# Altium PCB GR_carte_action27.PcbDoc
Units mil, origin at the board's own origin, x right, y up, seen from the top; angles counter-clockwise.
Board outline 3105 x 2675 mil, 2 copper layers (Top Layer, Bottom Layer); 55 components, 45 nets, 211 pads, 0 vias.
Unrouted connection lines stored in the file: 4.
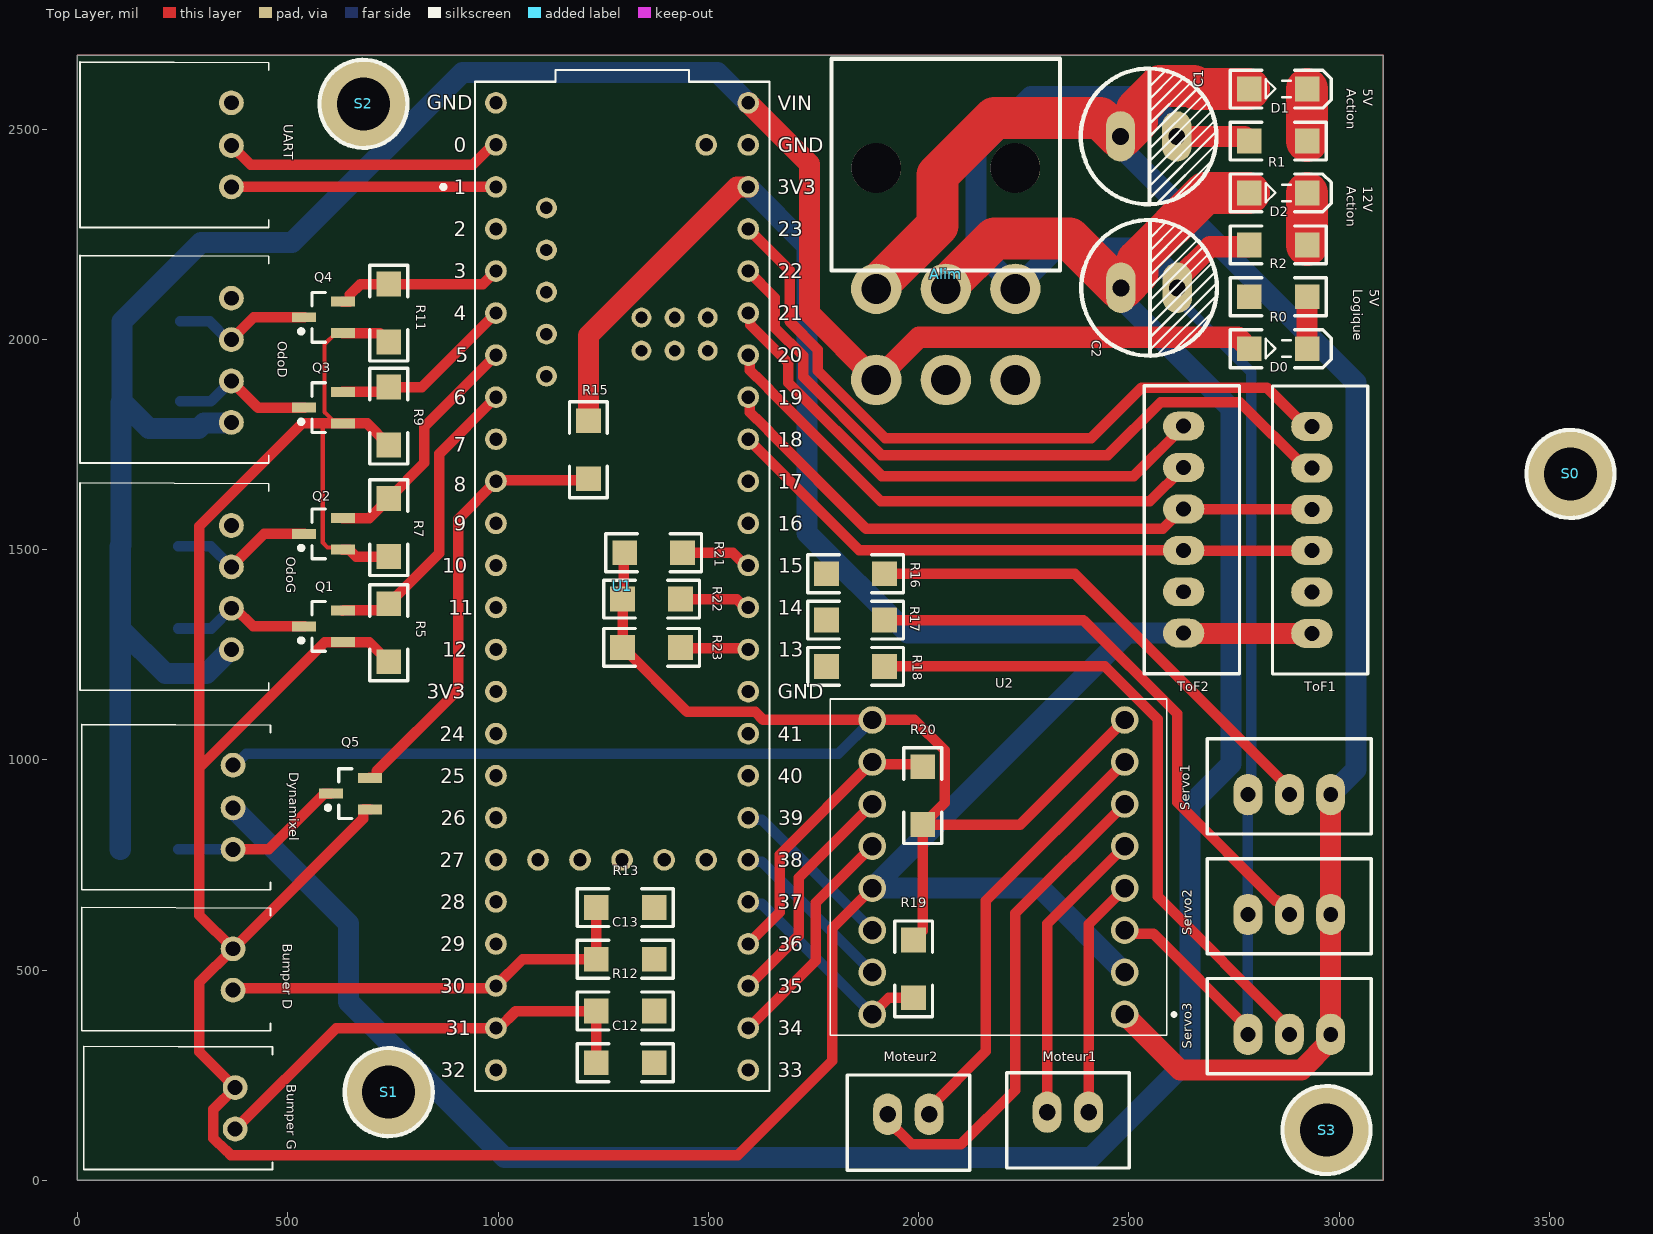
[diagram p0: Top Layer view]
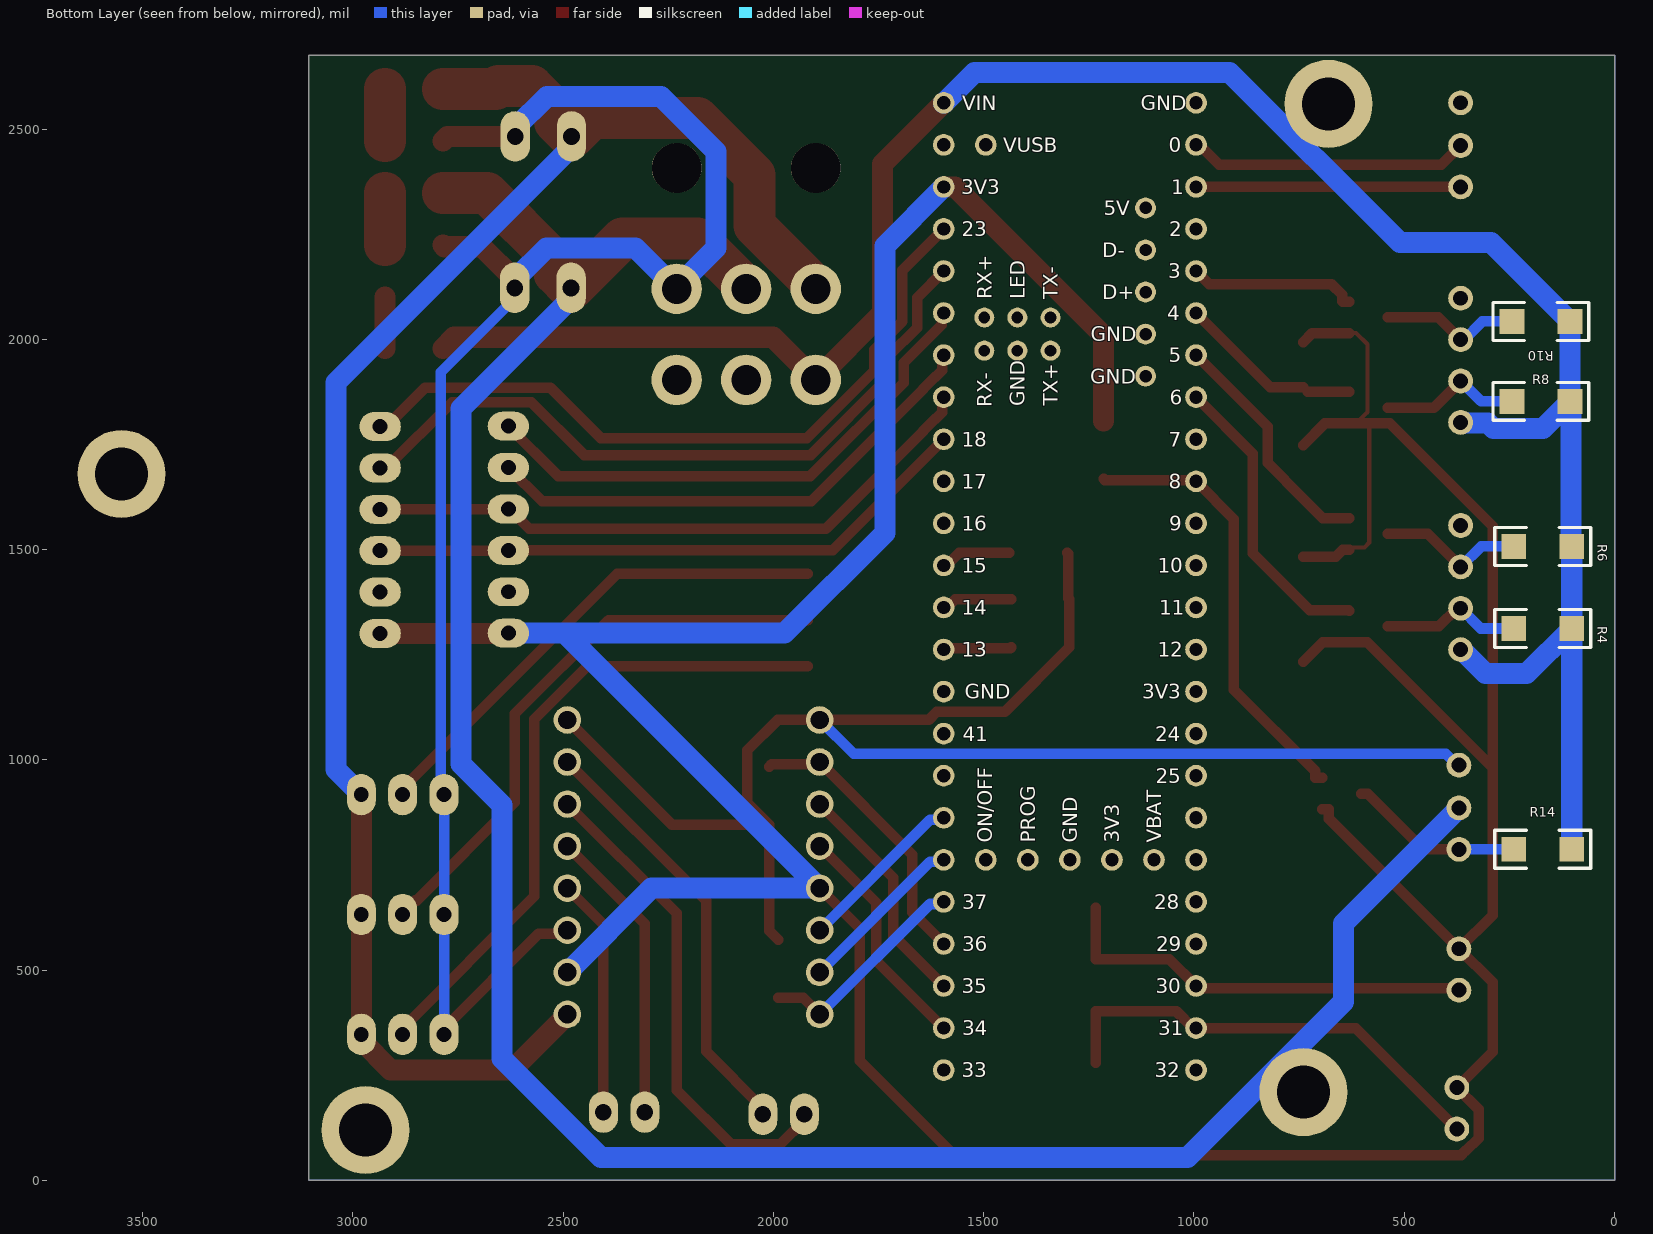
[diagram p1: Bottom Layer view, seen from below]
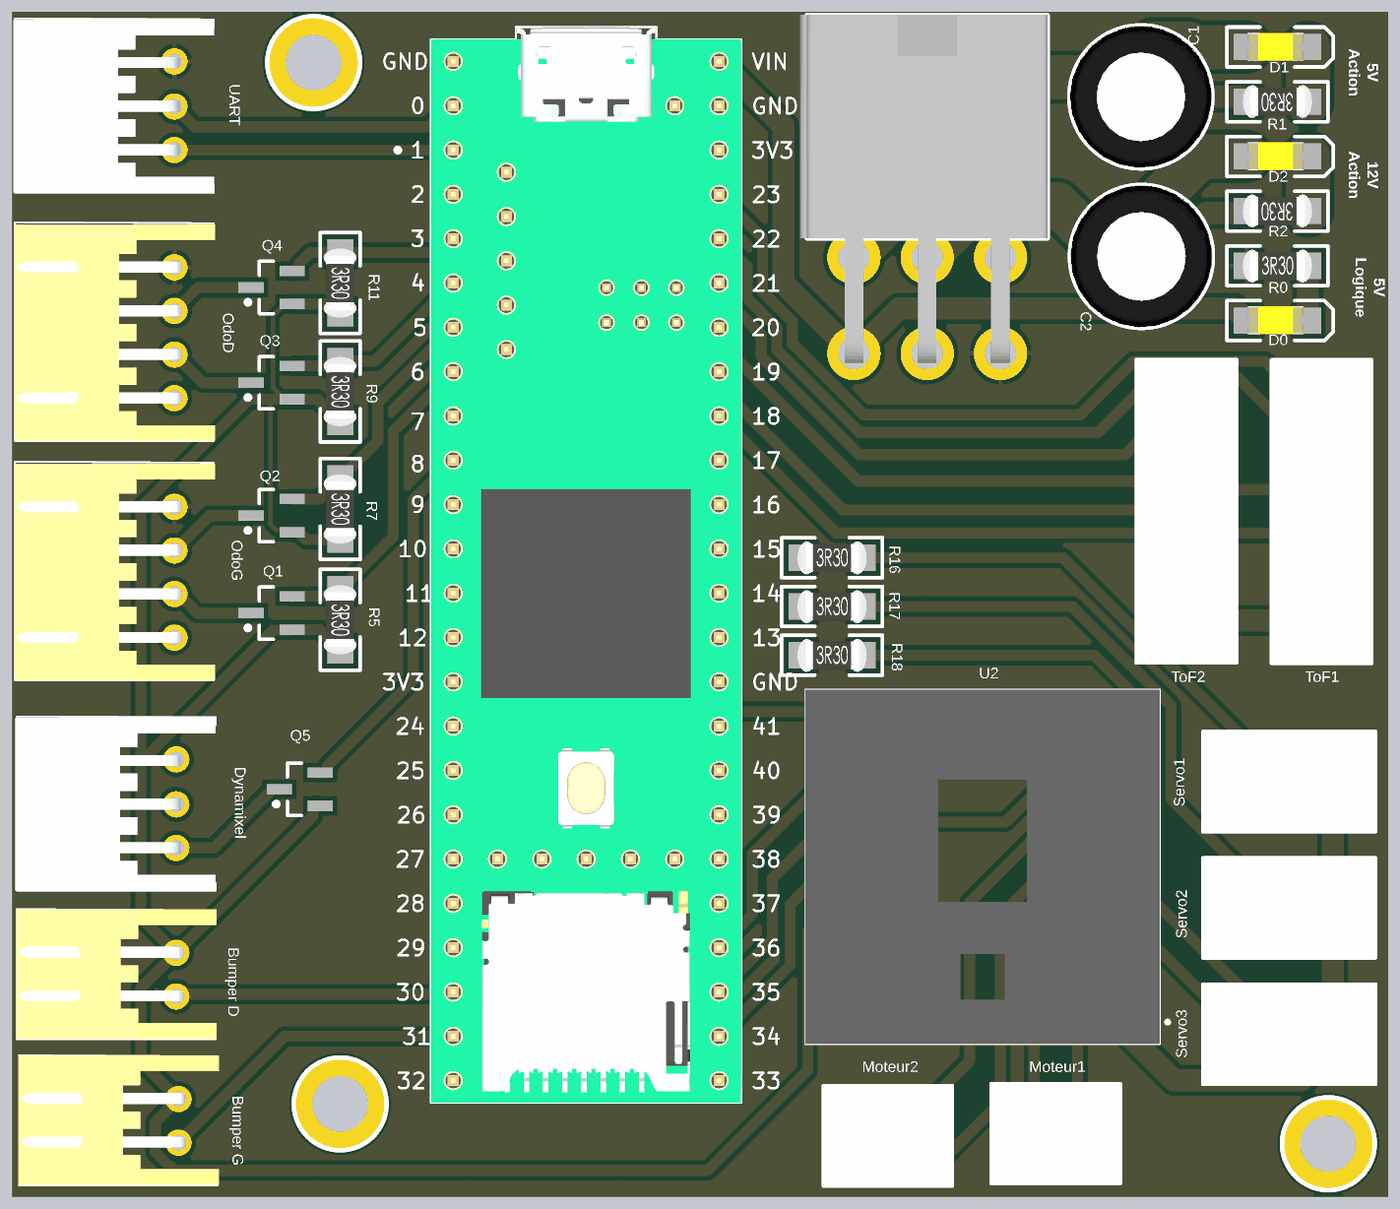
[diagram p2: 3D render of the assembled board from above, using the file's embedded part models]
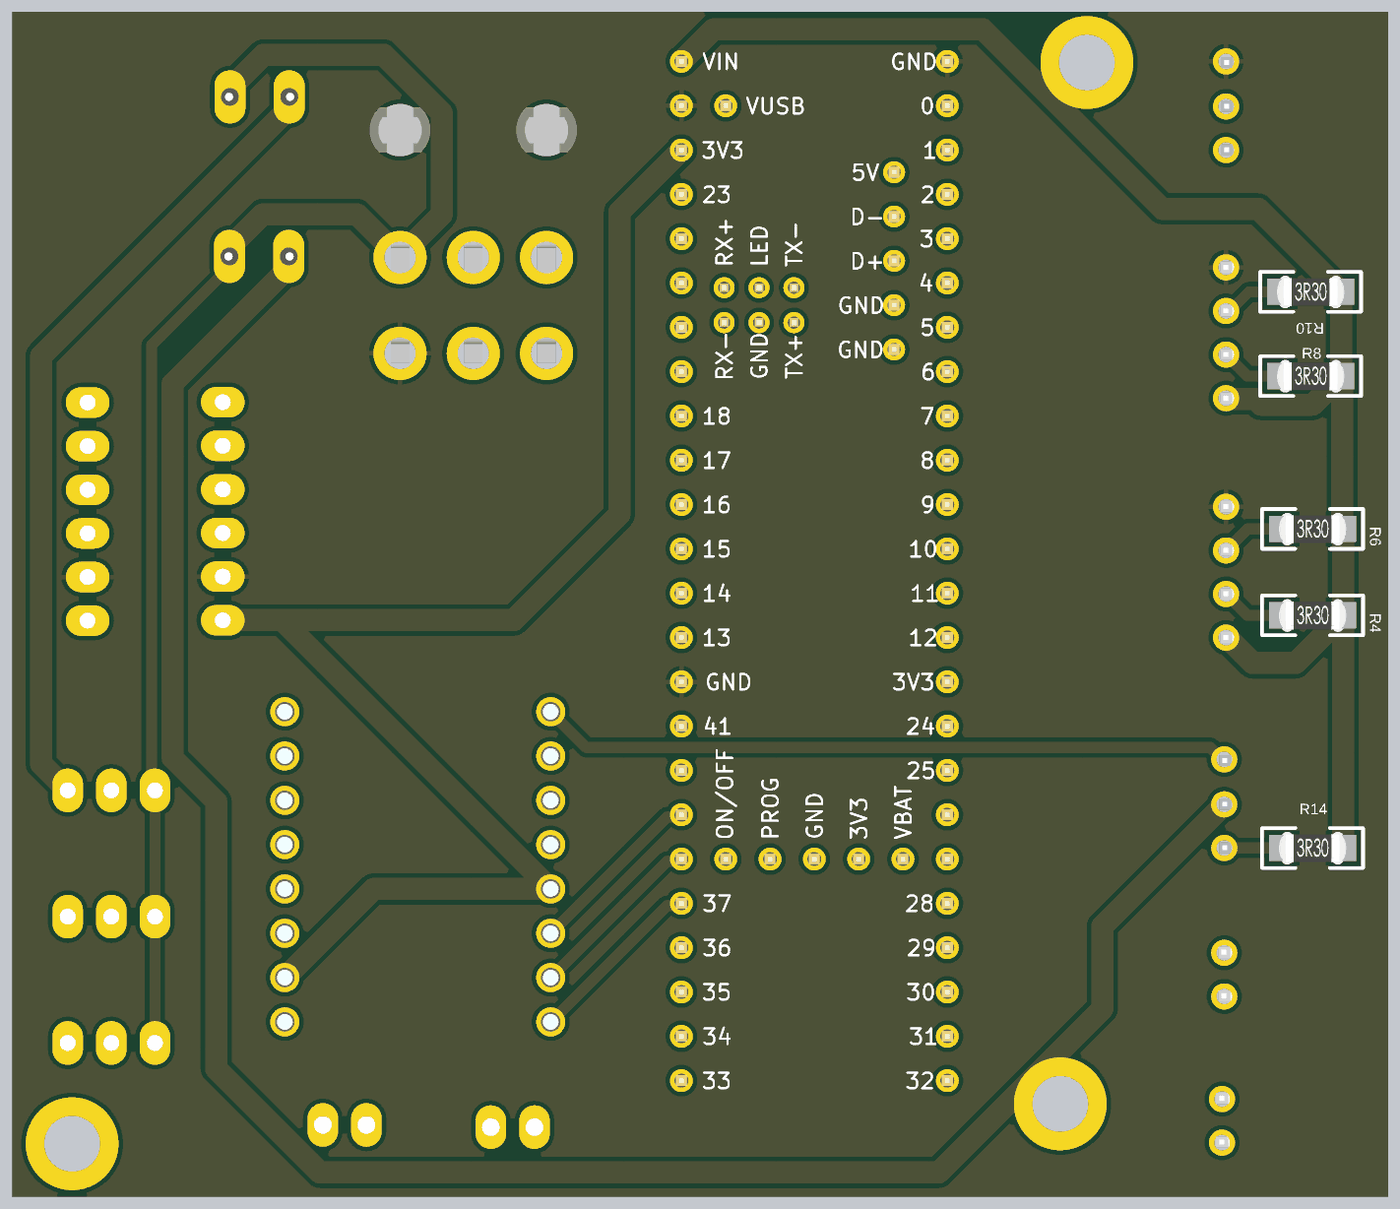
[diagram p3: 3D render of the assembled board from below, using the file's embedded part models]

## Layer stack, top to bottom
Top Solder: solder mask 0.4, Solder Resist, Dk 3.5
Top Layer: signal copper 1.4
Dielectric 1: dielectric 12.6, FR-4, Dk 4.8
Bottom Layer: signal copper 1.4
Bottom Solder: solder mask 0.4, Solder Resist, Dk 3.5

## Board outline
0,0 3105,0 3105,2675 0,2675

## Design rules (kind name [scope] priority, off if disabled: settings)
Clearance [All] p1: gap=10 ignorepadtopadclearanceinfootprint=FALSE
PolygonConnect [All] p1: connectstyle=Relief reliefconductorwidth=10 reliefentries=4 polygonreliefangle="90 Angle" airgapwidth=10
RoutingVias [All] p1: holewidth=28 width=50 viastyle="Through Hole" minholewidth=28 minwidth=50 maxholewidth=28 maxwidth=50
SolderMaskExpansion [All] p1: expansion=0 istentingtop=FALSE
SupplyNets "Schematic Supply Nets_6" [InNet('3.3V')] p1: voltage=0.000
SupplyNets "Schematic Supply Nets_5" [InNet('GND_L')] p2: voltage=0.000
SupplyNets "Schematic Supply Nets_4" [InNet('12V_A')] p3: voltage=0.000
SupplyNets "Schematic Supply Nets_2" [InNet('5V_A')] p4: voltage=0.000
SupplyNets "Schematic Supply Nets_1" [InNet('5V_L')] p5: voltage=0.000
SupplyNets "Schematic Supply Nets" [InNet('GND_A')] p6: voltage=0.000
Width [All] p1: maxlimit=100 minlimit=10 preferedwidth=25 minimp=50.000000 maximp=50.000000 favimp=50.000000
30 further rules are at their usual default settings.

## Classes and differential pairs
component class GR_carte_action_actionneurs27: Dynamixel Moteur1 Moteur2 Q5 R14 R15 R16 R17 R18 R19 R20 R21 R22 R23 Servo1 Servo2 Servo3 ToF1 ToF2 U2
component class GR_carte_action27: Alim "Bumper D" "Bumper G" C1 C2 C12 C13 D0 D1 D2 OdoD OdoG Q1 Q2 Q3 Q4 R0 R1 R2 R4 R5 R6 R7 R8 R9 R10 R11 R12 R13 S0 S1 S2 S3 U1 UART

## Components (designator, comment, footprint, x,y, rotation, side; value= is the part's Value field where it differs from the comment)
Alim "Header 3X2H" MOLEX_MINIFITJR_3X2 2064.65,2120.08 r180 top
"Bumper D" "Header 2H" S2B-XH-A 370,452.48 r90 top
"Bumper G" "Header 2H" S2B-XH-A 375,122.48 r90 top
C1 "Cap2" Condensateur 2480,2482.48 r0 top value=100µF
C2 "Cap2" Condensateur 2481.14,2122.48 r0 top value=100µF
C12 "Cap" "Capacitor 1206" 1302.48,280 r180 top value=100nF
C13 "Cap" "Capacitor 1206" 1302.48,525.96 r180 top value=100nF
D0 "5V_L" KP-3216SEC 2855,1977.8 r0 top
D1 "5V_A" KP-3216SEC 2855,2595 r0 top
D2 "12V_A" KP-3216SEC 2855,2348.12 r0 top
Dynamixel "JST XH 3" S3B-XH-A 370,787.48 r90 top
Moteur1 "Header 2H" "JST XH B2B-XH-A" 2355,162.48 r0 top
Moteur2 "Header 2H" "JST XH B2B-XH-A" 1975.79,157.48 r0 top
OdoD "JST XH 4" S4B-XH-A 365.87,1802.48 r90 top
OdoG "JST XH 4" S4B-XH-A 365.87,1262.17 r90 top
Q1 "MOSFET-N" SOT23_M 585,1317.48 r180 top
Q2 "MOSFET-N" SOT23_M 585,1537.48 r180 top
Q3 "MOSFET-N" SOT23_M 585,1837.48 r180 top
Q4 "MOSFET-N" SOT23_M 585,2052.48 r180 top
Q5 "MOSFET-N" SOT23_M 648.74,919.88 r180 top
R0 "Res2" "Resistor 1206" 2855,2101.24 r0 top value=300
R1 "Res2" "Resistor 1206" 2855,2471.56 r180 top value=300
R2 "Res2" "Resistor 1206" 2855,2224.68 r180 top value=1K3
R4 "Res2" "Resistor 1206" 170.59,1312.48 r180 bottom value=4.7K
R5 "Res2" "Resistor 1206" 740,1302.48 r270 top value=4.7K
R6 "Res2" "Resistor 1206" 170.59,1507.48 r180 bottom value=4.7K
R7 "Res2" "Resistor 1206" 740,1552.48 r270 top value=4.7K
R8 "Res2" "Resistor 1206" 175,1852.48 r180 bottom value=4.7K
R9 "Res2" "Resistor 1206" 740,1817.48 r270 top value=4.7K
R10 "Res2" "Resistor 1206" 175,2042.48 r180 bottom value=4.7K
R11 "Res2" "Resistor 1206" 740,2062.48 r270 top value=4.7K
R12 "Res2" "Resistor 1206" 1302.48,402.98 r180 top value=10K
R13 "Res2" "Resistor 1206" 1302.48,648.94 r180 top value=10K
R14 "Res2" "Resistor 1206" 170.59,787.48 r180 bottom value=2.2K
R15 "Res2" "Resistor 1206" 1215,1737.48 r90 top value=2.2K
R16 "Res2" "Resistor 1206" 1850,1442.48 r0 top value=330
R17 "Res2" "Resistor 1206" 1850,1332.48 r0 top value=330
R18 "Res2" "Resistor 1206" 1850,1222.48 r0 top value=330
R19 "Res2" "Resistor 1206" 1988.11,503.31 r90 top value=10K
R20 "Res2" "Resistor 1206" 2010,915 r90 top value=10K
R21 "Res2" "Resistor 1206" 1370,1492.48 r0 top value=10K
R22 "Res2" "Resistor 1206" 1365,1382.48 r0 top value=10K
R23 "Res2" "Resistor 1206" 1365,1267.48 r0 top value=10K
S0 "Screw M3" "Screw M3" 3550,1680 r0 top
S1 "Screw M3" "Screw M3" 740,210 r0 top
S2 "Screw M3" "Screw M3" 680,2560 r0 top
S3 "Screw M3" "Screw M3" 2970,120 r0 top
Servo1 "Header 3" "JST XH B3B-XH-A" 2881.5,917.48 r180 top
Servo2 "Header 3" "JST XH B3B-XH-A" 2881.5,632.48 r180 top
Servo3 "Header 3" "JST XH B3B-XH-A" 2881.5,347.48 r180 top
ToF1 "Header 6" "JST XH B6B-XH-A" 2935,1546.69 r90 top
ToF2 "Header 6" "JST XH B6B-XH-A" 2630,1547.48 r90 top
U1 "TEENSY_4.1" Teensy_4.1 1295,1412.48 r270 top value="TEENSY 4.1"
U2 "ROB-14450" ROB14450 2190,745 r90 top
UART "JST XH 3" S3B-XH-A 365.87,2362.48 r90 top

## Footprints (in the part's own frame and the unit in brackets; to place one, negate y for a bottom-side part, rotate by r counter-clockwise, add the part's x,y. Pads: shape width x height; smd on the part's side, far side on the other; paste and mask are expansions set on the pad)
"Capacitor 1206" [mm]
  rect 1.5x1.5 smd: 1(-1.75,0) 2(1.75,0)
  silkscreen extent -2.89,-1.14 2.89,1.14, body extent -1.98,-0.99 1.98,0.96, height 1.3
Condensateur [mil]
  oval 70x120 hole 40: 1(0,0) 2(133.86,0)
  silkscreen extent -94,-161 228,161, body extent -93,-160 227,160, height 500
"JST XH B2B-XH-A" [mm]
  oval 1.75x2.5 hole 1: 1(-1.25,0) 2(1.25,0)
  silkscreen extent -3.7,-3.38 3.7,2.38, body extent -3.7,-3.38 3.7,2.38, height 7
"JST XH B3B-XH-A" [mm]
  oval 1.75x2.5 hole 0.9: 1(-2.5,0) 2(0,0) 3(2.5,0)
  silkscreen extent -4.95,-3.38 4.95,2.38, body extent -4.95,-3.37 4.95,2.38, height 7
"JST XH B6B-XH-A" [mm]
  oval 1.75x2.5 hole 0.9: 1(-6.25,0) 2(-3.75,0) 3(-1.25,0) 4(1.25,0) 5(3.75,0) 6(6.25,0)
  silkscreen extent -8.7,-3.38 8.7,2.38, body extent -8.7,-3.38 8.7,2.38, height 7
KP-3216SEC [mm]
  rect 1.5x1.5 smd: 1(-1.75,0) 2(1.75,0)
  silkscreen extent -2.89,-1.14 3.2,1.14, body extent -1.7,-0.79 1.5,0.81, height 1.1
MOLEX_MINIFITJR_3X2 [mm] "MOLEX_MINIFITJR_3X2, 39-30-1060"
  round 3.048 hole 1.8: 1(-4.2,5.5) 2(-4.2,0) 3(0,5.5) 4(0,0) 5(4.2,5.5) 6(4.2,0)
  round 3 hole 3 unplated: 10(-4.2,-7.3) 11(4.2,-7.3)
  silkscreen extent -6.9,-13.9 6.9,-1.1, body extent -6.9,-13.9 7.3,6.04, height 11.41
"Resistor 1206" [mm]
  rect 1.5x1.5 smd: 1(-1.75,0) 2(1.75,0)
  silkscreen extent -2.89,-1.14 2.89,1.14, body extent -1.98,-0.95 1.98,0.93, height 0.55
ROB14450 [mm]
  round 1.665 hole 1.11: 1(-8.89,-7.62) 2(-6.35,-7.62) 3(-3.81,-7.62) 4(-1.27,-7.62) 5(1.27,-7.62) 6(3.81,-7.62) 7(6.35,-7.62) 8(8.89,-7.62) 9(-8.89,7.62) 10(-6.35,7.62) 11(-3.81,7.62) 12(-1.27,7.62) 13(1.27,7.62) 14(3.81,7.62) 15(6.35,7.62) 16(8.89,7.62)
  silkscreen extent -10.16,-10.7 10.16,10.16, body extent -10.16,-10.16 10.16,10.16, height 5.1
S2B-XH-A [mm]
  round 1.5 hole 0.9: 1(0,0) 2(2.5,0)
  silkscreen extent -2.45,-2.26 5,9.14, body extent -2.41,-2.32 4.99,9.18, height 6.15
S3B-XH-A [mm]
  round 1.5 hole 0.9: 1(0,0) 2(2.5,0) 3(5.08,0)
  silkscreen extent -2.45,-2.26 7.54,9.14, body extent -2.44,-2.27 7.46,9.23, height 6.15
S4B-XH-A [mm]
  round 1.5 hole 0.9: 1(0,0) 2(2.5,0) 3(5,0) 4(7.5,0)
  silkscreen extent -2.45,-2.26 10.08,9.14, body extent -2.44,-2.32 9.96,9.18, height 6.15
"Screw M3" [mm] "M3 iso Screw"
  round 5.32 hole 3.2 unplated: 0(0,0)
  silkscreen extent -2.66,-2.66 2.66,2.66
SOT23_M [mm] "SOT23, 3-Leads, Body 2.9x1.3mm, Pitch 0.95mm, Lead Span 2.3mm - Reverse Pinning, IPC Low Density"
  rect 1.45x0.6 smd: 1(1.175,0) 2(-1.175,-0.95) 3(-1.175,0.95)
  silkscreen extent -0.1,-1.5 1.47,1.5, body extent -0.7,-1.5 0.7,1.5, height 1.1
Teensy_4.1 [mm]
  round 1.308 hole 0.8: 0(-26.67,-7.62) 1(-24.13,-7.62) 2(-21.59,-7.62) 3(-19.05,-7.62) 3.3V_1(6.35,-7.62) 3.3V_2(-24.13,7.62) 3.3V_3(16.51,-2.54) 4(-16.51,-7.62) 5(-13.97,-7.62) 6(-11.43,-7.62) 7(-8.89,-7.62) 8(-6.35,-7.62) 9(-3.81,-7.62) 10(-1.27,-7.62) 11(1.27,-7.62) 12(3.81,-7.62) 13(3.81,7.62) 14(1.27,7.62) 15(-1.27,7.62) 16(-3.81,7.62) 17(-6.35,7.62) 18(-8.89,7.62) 19(-11.43,7.62) 20(-13.97,7.62) 21(-16.51,7.62) 22(-19.05,7.62) 23(-21.59,7.62) 24(8.89,-7.62) 25(11.43,-7.62) 26(13.97,-7.62) 27(16.51,-7.62) 28(19.05,-7.62) 29(21.59,-7.62) 30(24.13,-7.62) 31(26.67,-7.62) 32(29.21,-7.62) 33(29.21,7.62) 34(26.67,7.62) 35(24.13,7.62) 36(21.59,7.62) 37(19.05,7.62) 38(16.51,7.62) 39(13.97,7.62) 40(11.43,7.62) 41(8.89,7.62) GND1(-29.21,-7.62) GND2(6.35,7.62) GND3(-26.67,7.62) GND4(16.51,0) ON/OFF(16.51,5.08) PROGRAM(16.51,2.54) VBAT(16.51,-5.08) VIN(-29.21,7.62) VUSB(-26.67,5.08)
  round 1.258 hole 0.75: 5V(-22.86,-4.57) D+(-17.78,-4.57) D-(-20.32,-4.57) USB_GND1(-15.24,-4.57) USB_GND2(-12.7,-4.57)
  round 1.208 hole 0.7: GND5(-14.24,3.17) LED(-16.24,3.17) RX+(-16.24,5.17) RX-(-14.24,5.17) TX+(-14.24,1.17) TX-(-16.24,1.17)
  silkscreen extent -31.18,-10.92 30.48,8.89, body extent -31.18,-8.89 30.48,8.89, height 7.15

## Part data
Alim: "Header, 3-Pin, Dual row, Right Angle", LatestRevisionDate=17-Jul-2002, LatestRevisionNote="Re-released for DXP Platform.", Publisher="Altium Limited"
"Bumper D" "Bumper G" Moteur1 Moteur2: "Header, 2-Pin, Right Angle", LatestRevisionDate=17-Jul-2002, LatestRevisionNote="Re-released for DXP Platform.", Publisher="Altium Limited"
C1 C2 C12 C13: "Capacitor", Publisher="Altium Limited"
  C1 C2: PackageDescription="Capacitor; 2 Leads", PackageReference=CAPR5-4X5, Published=23-Sep-2002
  C12 C13: LatestRevisionDate=17-Jul-2002, LatestRevisionNote="Re-released for DXP Platform.", PackageDescription="Radial Cap, Thru-Hole; 2 Leads; 0.3 in Pin Spacing", PackageReference=RAD-0.3, Published=8-Jun-2000
D0 D1 D2: library part LED2, "Typical RED, GREEN, YELLOW, AMBER GaAs LED", LatestRevisionDate=17-Jul-2002, LatestRevisionNote="Re-released for DXP Platform.", PackageDescription="SM LED; 2 Flat Leads", PackageReference=3.2X1.6X1.1, PackageVersion=Feb-2002, Published=8-Jun-2000, Publisher="Altium Limited"
Dynamixel UART: library part "Header 3H", "Header, 3-Pin, Right Angle", LatestRevisionDate=17-Jul-2002, LatestRevisionNote="Re-released for DXP Platform.", Publisher="Altium Limited"
OdoD OdoG: library part "Header 4H", "Molex SPOX 4x1H", LatestRevisionDate=17-Jul-2002, LatestRevisionNote="Re-released for DXP Platform.", Publisher="Altium Limited"
Q1 Q2 Q3 Q4 Q5: "N-Channel MOSFET", LatestRevisionDate=17-Jul-2002, LatestRevisionNote="Re-released for DXP Platform.", PackageDescription="TO, Flat Index; 3 In-Line, Axial Leads; Body Dia. 4.6mm; Lead Dia. 0.5 mm (max)", PackageReference=E3, PackageVersion=1995/1996, Published=8-Jun-2000, Publisher="Altium Limited"
R0 R1 R2 R4 R5 R6 R7 R8 R9 R10 R11 R12 R13 R14 R15 R16 R17 R18 R19 R20 R21 R22 R23: "Resistor", LatestRevisionDate=17-Jul-2002, LatestRevisionNote="Re-released for DXP Platform.", PackageDescription="Axial Device, Thru-Hole; 2 Leads; 0.4 in Pin Spacing", PackageReference=AXIAL-0.4, Published=8-Jun-2000, Publisher="Altium Limited"
Servo1 Servo2 Servo3: "Header, 3-Pin", LatestRevisionDate=17-Jul-2002, LatestRevisionNote="Re-released for DXP Platform.", Publisher="Altium Limited"
ToF1 ToF2: "Header, 6-Pin", LatestRevisionDate=17-Jul-2002, LatestRevisionNote="Re-released for DXP Platform.", Publisher="Altium Limited"
U1: "RT1062 Teensy 4.1 w/ Headers RT1062 600 MHZ", Manufacturer=PJRC, Manufacturer_Part_Number=DEV-16996, ComponentLink1Description=pin_function_front, ComponentLink1URL=https://www.pjrc.com/teensy/card11a_rev4_web.pdf, ComponentLink2Description=pin_function_back, ComponentLink2URL=https://www.pjrc.com/teensy/card11b_rev4_web.pdf, ComponentLink3Description=Digikey, ComponentLink3URL=https://www.digikey.com/en/products/detail/sparkfun-electronics/16996/13158152, ComponentLink4Description=Datasheet, ComponentLink4URL=https://mm.digikey.com/Volume0/opasdata/d220001/medias/docus/2942/DEV-16996_Web.pdf
U2: "Undefined or Miscellaneous", Manufacturer_Name=SparkFun, Mouser Part Number=474-ROB-14450, Arrow Part Number=ROB-14450, Arrow Price/Stock=https://www.arrow.com/en/products/rob-14450/sparkfun-electronics?region=nac, Datasheet Link=https://www.sparkfun.com/products/14450, Height=5mm, Manufacturer_Part_Number=ROB-14450, Mouser Price/Stock=https://www.mouser.co.uk/ProductDetail/SparkFun/ROB-14450?qs=wd5RIQLrsJhQdlH%2FW5H2aQ%3D%3D

## Nets (pads, with @x,y where several pads share a name; then routed paths per layer and width w, separated by ;. In a path a pad name is that pad's centre, name@x,y a point inside that pad or via, vN(x,y) a via of type N, cw(c..) or ccw(c..) an arc to the next point about the centre after c; other vN are vias at no path point)
3.3V: "Bumper D.2" "Bumper G.2" Q1.3 Q2.3 Q3.3 Q4.3 Q5.3 R5.2 R7.2 R9.2 R11.2 R15.2 ToF1.1 ToF2.1 U1.3.3V_2 U2.2 U2.12 | length 10524.4
  Top Layer w10: 583.09,1800.08 583.09,1516.91 594.81,1505.19 626.15,1505.19 Q2.3 ; Q3.3@614.53,1800.08 587.72,1826.89 587.72,1988.27 614.53,2015.08 Q4.3
  Top Layer w25: Q2.3 646.61,1500.08 663.11,1483.58 R7.2 ; Q4.3 718.5,2015.08 R11.2 ; Q5.3 679.65,882.48 678.96,881.79 678.96,859.86 370,550.91 ; R5.2 693.5,1280.08 Q1.3 630.57,1279.39 588.33,1279.39 290,981.06 ; R9.2 688.5,1800.08 Q3.3 607.72,1800.08 583.09,1800.08 534.93,1800.08 290,1555.15 290,981.06 ; U2.12 1795,600 1795,285 1570,60 365,60 354.55,70.45 353.45,70.45 322.97,100.93 322.97,168.88 375,220.91 290,305.91 290,470.91 370,550.91 ; 290,981.06 290,630.91 370,550.91
  Top Layer w50: R15.2 1215,2008.91 1568.28,2362.19 1594.71,2362.19 U1.3.3V_2 ; ToF2.1 2630.39,1301.02 2934.61,1301.02 ToF1.1
  Bottom Layer w50: U1.3.3V_2 1735,2222.48 1735,1540 1973.58,1301.42 2496.42,1301.42 ; U2.2 2290,695 U2.12 2496.42,1301.42 ; ToF2.1 2496.42,1301.42
5V_A: Alim.6 C1.1 D1.1 Servo1.1 Servo2.1 Servo3.1 U2.1 | length 4202.7
  Top Layer w50: U2.1 2621.73,263.27 2910.26,263.27 2979.92,332.93 Servo3.1 Servo2.1 Servo1.1
  Top Layer w100: Alim.6 1899.29,2125.49 2044.54,2270.74 2044.54,2390.39 2180.69,2526.54 2430.95,2526.54 2475,2482.48 C1.1 2485,2482.48 2518.86,2516.34 2518.86,2546.83 2574.51,2602.48 2653.21,2602.48 2660.69,2595 D1.1
  Bottom Layer w50: C1.1 2480,2457.48 3040,1897.48 3040,977.56 2998.3,935.86 2988.65,935.86 2979.92,927.13 Servo1.1
5V_L: Alim.5 D0.1 OdoD.1 OdoG.1 R4.2 R6.2 R8.2 R10.2 R14.2 U1.VIN | length 5371.2
  Top Layer w50: U1.VIN 1740.59,2416.89 1740.59,2062.24 Alim.5 2000.75,2005 2758.9,2005 D0.1
  Bottom Layer w50: R14.2 R4.2 ; OdoG.1 363.42,1262.17 306.25,1205 209.17,1205 R4.2 ; OdoD.1 364.13,1800.75 300.72,1800.75 287.92,1787.95 170.63,1787.95 R8.2 ; U1.VIN 1594.6,2562.48 1522.08,2635 915,2635 510,2230 293.62,2230 R10.2 R8.2 ; R4.2 R6.2 103.9,1509.69 103.9,1850.28 R8.2
12V_A: Alim.4 C2.1 D2.1 Dynamixel.2 | length 5740.8
  Top Layer w100: Alim.4 2064.65,2124.43 2180.29,2240.08 2358.54,2240.08 2476.14,2122.48 C2.1 2486.14,2122.48 2520,2156.34 2520,2186.83 2681.29,2348.12 D2.1
  Bottom Layer w50: Dynamixel.2 645,610.91 645,425 1015,55 2410,55 2645,290 2645,892.39 2743.16,990.55 2743.16,1835.46 2481.14,2097.48 C2.1
AX12_data: Dynamixel.1 Q5.1 R14.1 | length 417.8
  Top Layer w25: Dynamixel.1 454.72,787.48 587.13,919.88 Q5.1
  Bottom Layer w25: R14.1 Dynamixel.1
GND_A: Alim.2 C1.2 C2.2 Dynamixel.3 R1.2 R2.2 R19.2 R20.1 R21.1 R22.1 R23.1 Servo1.3 Servo2.3 Servo3.3 U2.3 U2.8 U2.16 | length 7804.5
  Top Layer w25: R21.1 1298.6,1489.98 1298.6,1384.98 R22.1 R23.1 1449.35,1114.23 1611.48,1114.23 1630.71,1095 U2.16 1989.77,1095 2062.03,1022.74 2062.03,898.13 R20.1 ; R19.2 2010,594.09 R20.1 ; U2.3 2497.76,587.24 2558.07,587.24 2783.07,362.24 Servo3.3 ; U2.8 2241.1,846.1 R20.1
  Top Layer w50: C1.2 2775.18,2482.48 R1.2 ; C2.2 2615,2142.07 2693.08,2220.15 2781.57,2220.15 R2.2
  Bottom Layer w25: Dynamixel.3 374.92,987.48 401.67,1014.23 1809.23,1014.23 U2.16 ; C2.2 2615,2097.48 2790.66,1921.82 2790.66,925.07 Servo1.3 Servo2.3 Servo3.3
  Bottom Layer w50: C1.2 2613.86,2502.07 2538.45,2577.48 2266.99,2577.48 2135.94,2446.44 2135.94,2216.94 2230,2122.89 Alim.2 2327.4,2217.48 2539.59,2217.48 2615,2142.07 C2.2
GND_L: Alim.1 C12.1 C13.1 OdoD.4 OdoG.4 R0.1 R12.1 R13.1 ToF1.2 ToF2.2 U1.GND1 U1.GND2 U1.GND3 UART.3
M1+: Moteur1.2 U2.4 | length 568.1
  Top Layer w25: Moteur1.2 2404.21,609.21 U2.4
M1-: Moteur1.1 U2.5 | length 708.8
  Top Layer w25: Moteur1.1 2305.79,610.79 U2.5
M2+: Moteur2.2 U2.7 | length 1030.1
  Top Layer w25: Moteur2.2 2025,172.24 2160,307.24 2160,665 U2.7
M2-: Moteur2.1 U2.6 | length 1183
  Top Layer w25: Moteur2.1 1926.57,142.72 1983.52,85.77 2100.77,85.77 2230,215 2230,635 U2.6
NetD0_2: D0.2 R0.2 | length 123.4
  Top Layer w50: D0.2 R0.2
NetD1_2: D1.2 R1.1 | length 123.4
  Top Layer w100: R1.1 D1.2
NetD2_2: D2.2 R2.1 | length 123.4
  Top Layer w100: R2.1 D2.2
NetR16_2: R16.2 Servo1.2 | length 1188.7
  Top Layer w25: R16.2 2371.26,1442.48 2881.5,932.24 Servo1.2
NetR17_2: R17.2 Servo2.2 | length 1377.6
  Top Layer w25: R17.2 2392.02,1332.48 2615,1109.5 2615,898.98 2848.24,665.74 2851.12,665.74 2881.5,635.37 Servo2.2
NetR18_2: R18.2 Servo3.2 | length 1580.5
  Top Layer w25: R18.2 2442.52,1222.48 2568.13,1096.87 2568.13,675.61 2881.5,362.24 Servo3.2
OdoD_A: OdoD.2 Q3.1 R8.1 | length 341.2
  Top Layer w25: OdoD.2 429.29,1837.48 Q3.1
  Bottom Layer w25: R8.1 317.44,1852.48 OdoD.2
OdoD_B: OdoD.3 Q4.1 R10.1 | length 334.7
  Top Layer w25: OdoD.3 419.02,2052.48 Q4.1
  Bottom Layer w25: R10.1 314.22,2042.48 357.37,1999.33 OdoD.3
OdoG_A: OdoG.2 Q1.1 R4.1 | length 337
  Top Layer w25: OdoG.2 374.44,1360.59 417.55,1317.48 Q1.1
  Bottom Layer w25: R4.1 317.76,1312.48 OdoG.2
OdoG_B: OdoG.3 Q2.1 R6.1 | length 351.8
  Top Layer w25: OdoG.3 444.33,1537.48 Q2.1
  Bottom Layer w25: R6.1 317.4,1507.48 OdoG.3
ODrive_RX1: U1.1 UART.1 | length 629.1
  Top Layer w25: UART.1 U1.1
ODrive_TX1: U1.0 UART.2 | length 667.8
  Top Layer w25: UART.2 411.77,2415 940.35,2415 987.83,2462.48 U1.0
PWM_MD: R19.1 U1.37 U2.9 | length 520.2
  Top Layer w25: U2.9 1929.41,434.41 R19.1
  Bottom Layer w25: U1.37 1600.07,657.41 1627.59,657.41 U2.9
PWM_MG: R20.2 U1.36 U2.15 | length 679.3
  Top Layer w25: U1.36 1670,637.48 1670,775 U2.15 1895.55,989.45 2004.45,989.45 R20.2
"Sens1 MD": U1.39 U2.11 | length 405.8
  Bottom Layer w25: U1.39 1600.07,857.41 1627.59,857.41 U2.11
"Sens1 MG": U1.34 U2.13 | length 554.7
  Top Layer w25: U1.34 1755,522.48 1755,660 U2.13
"Sens2 MD": U1.38 U2.10 | length 405.8
  Bottom Layer w25: U1.38 1600.07,757.41 1627.59,757.41 U2.10
"Sens2 MG": U1.35 U2.14 | length 554.7
  Top Layer w25: U1.35 1715,582.48 1715,720 U2.14
T_AX12_data: Q5.2 R15.1 U1.8 | length 1061
  Top Layer w25: Q5.2 710.35,957.28 711.04,957.97 711.04,973.33 905,1167.28 905,1572.48 U1.8 998.05,1665.53 1211.95,1665.53 R15.1
T_Bump_ArD: "Bumper D.1" C13.2 R13.2 U1.30 | length 1017
  Top Layer w25: 370,452.48 375,457.48 990,457.48 U1.30 1058.48,525.96 C13.2 R13.2
T_Bump_ArG: "Bumper G.1" C12.2 R12.2 U1.31 | length 1097.7
  Top Layer w25: 375,122.48 615,362.48 U1.31 1002.17,362.48 1042.67,402.98 R12.2 C12.2
T_GPIO1: ToF1.6 U1.23 | length 1734.7
  Top Layer w25: U1.23 1693.09,2164.39 1693.09,2042.57 1760.35,1975.31 1760.35,1925.82 1921.16,1765 2410,1765 2530.49,1885.49 2827.5,1885.49 2920.24,1792.76 ToF1.6
T_GPIO2: ToF2.6 U1.21 | length 1285.8
  Top Layer w25: U1.21 1600.07,2057.41 1600.07,2034.93 1690.35,1944.65 1690.35,1896.82 1912.17,1675 2511.46,1675 ToF2.6
T_I2C_SCL: ToF1.4 ToF2.4 U1.19 | length 1508.8
  Top Layer w25: U1.19 1598.48,1859 1598.48,1826.52 1614.27,1810.73 1614.98,1810.73 1643.25,1782.47 1643.25,1781.75 1875,1550 2580.89,1550 2595.53,1564.64 2595.53,1565.11 2627.11,1596.69 ToF2.4 2630.39,1596.3 2934.61,1596.3 ToF1.4
T_I2C_SDA: ToF1.3 ToF2.3 U1.18 | length 1449.8
  Top Layer w25: U1.18 1859.21,1498.27 ToF2.3 2630.39,1497.87 2934.61,1497.87 ToF1.3
T_odoD_A: Q3.2 R9.1 U1.4 | length 426.2
  Top Layer w25: Q3.2 631.95,1875.57 R9.1@729.19,1875.57 ; R9.1 818.9,1886.38 U1.4
T_odoD_B: Q4.2 R11.1 U1.3 | length 402.7
  Top Layer w25: Q4.2 646.61,2089.88 647.3,2090.57 647.3,2105.71 672.97,2131.38 963.9,2131.38 U1.3
T_odoG_A: Q1.2 R5.1 U1.6 | length 712.3
  Top Layer w25: Q1.2 631.95,1355.57 724.19,1355.57 860,1491.38 860,1727.48 U1.6
T_odoG_B: Q2.2 R7.1 U1.5 | length 574.7
  Top Layer w25: Q2.2 693.5,1574.88 R7.1 825,1706.38 825,1792.48 U1.5
T_servo1: R16.1 R21.2 U1.15 | length 168.5
  Top Layer w25: R21.2 1557.83,1492.48 1587.83,1462.48 U1.15
T_servo2: R17.1 R22.2 U1.14 | length 169.4
  Top Layer w25: R22.2 1567.83,1382.48 1587.83,1362.48 U1.14
T_servo3: R18.1 R23.2 U1.13 | length 163.2
  Top Layer w25: R23.2 1436.4,1264.98 1592.5,1264.98 U1.13
T_XSHUT1: ToF1.5 U1.22 | length 1708.6
  Top Layer w25: U1.22 1658.09,2099.39 1658.09,2028.07 1725.35,1960.82 1725.35,1911.32 1911.66,1725 2450,1725 2575.49,1850.49 2764.07,1850.49 2920.24,1694.33 ToF1.5
T_XSHUT2: ToF2.5 U1.20 | length 1231.6
  Top Layer w25: U1.20 1598.48,1959 1598.48,1926.52 1614.27,1910.73 1614.98,1910.73 1643.25,1882.47 1643.25,1881.75 1910,1615 2549.88,1615 ToF2.5
pads on no net: Alim.3 Alim.10 Alim.11 S0.0 S1.0 S2.0 S3.0 U1.2 U1.3.3V_1 U1.3.3V_3 U1.5V U1.7 U1.9 U1.10 U1.11 U1.12 U1.16 U1.17 U1.24 U1.25 U1.26 U1.27 U1.28 U1.29 U1.32 U1.33 U1.40 U1.41 U1.D+ U1.D- U1.GND4 U1.GND5 U1.LED U1.ON/OFF U1.PROGRAM U1.RX+ U1.RX- U1.TX+ U1.TX- U1.USB_GND1 U1.USB_GND2 U1.VBAT U1.VUSB

## Polygon pours and split planes (outlines as drawn)
GND_L on Top Layer "NONET_L01_P000" (solid, remove dead copper, shelved, pour order 0): 0,0 3105,0 3105,2675 0,2675
GND_L on Bottom Layer "NONET_L02_P001" (solid, remove dead copper, shelved, pour order 1): 0,0 3105,0 3105,2675 0,2675

## Silkscreen, mask and mechanical layers (free items; w line width, h text height)
Top Overlay:
  text "5V / Action" at 3010,2595.34 h39.37 r270
  text "12V / Action" at 3010,2364.2 h39.37 r270
  text "5V / Logique" at 3025,2118.9 h39.37 r270

## Text inside footprints (layer, text, board x,y; h text height)
U1: Top Overlay "12" at 867.01,1244.97 h35; Top Overlay "11" at 882.01,1344.97 h35; Top Overlay "5" at 900,1944.96 h35; Top Overlay "GND" at 830,2545.46 h35; Top Overlay "0" at 895,2445.46 h35; Top Overlay "1" at 895,2345.46 h35; Top Overlay "2" at 895,2245.46 h35; Top Overlay "3" at 895,2145.46 h35; Top Overlay "4" at 895,2045.46 h35; Top Overlay "6" at 895,1844.96 h35; Top Overlay "7" at 895,1732.46 h35; Top Overlay "8" at 895,1637.46 h35; Top Overlay "9" at 895,1545.46 h35; Top Overlay "10" at 867,1445.46 h35; Top Overlay "3V3" at 831.01,1144.97 h35; Top Overlay "24" at 861.01,1044.98 h35; Top Overlay "25" at 862.01,944.98 h35; Top Overlay "26" at 864.01,844.98 h35; Top Overlay "27" at 861.01,744.98 h35; Top Overlay "28" at 862.01,644.98 h35; Top Overlay "29" at 863.01,544.98 h35; Top Overlay "30" at 862.01,444.98 h35; Top Overlay "31" at 876.01,344.98 h35; Top Overlay "VIN" at 1665,2544.98 h35; Top Overlay "GND" at 1664.99,2444.98 h35; Top Overlay "3V3" at 1664,2344.98 h35; Top Overlay "23" at 1665,2244.98 h35; Top Overlay "22" at 1665,2144.98 h35; Top Overlay "21" at 1665,2044.98 h35; Top Overlay "20" at 1664,1944.98 h35; Top Overlay "19" at 1665,1844.98 h35; Top Overlay "18" at 1665,1744.98 h35; Top Overlay "17" at 1665,1644.98 h35; Top Overlay "16" at 1665,1544.98 h35; Top Overlay "15" at 1666,1444.98 h35; Top Overlay "14" at 1665,1344.98 h35; Top Overlay "13" at 1666,1244.98 h35; Top Overlay "GND" at 1665,1144.98 h35; Top Overlay "41" at 1665,1044.98 h35; Top Overlay "40" at 1665,944.98 h35; Top Overlay "39" at 1666,844.98 h35; Top Overlay "38" at 1665,744.98 h35; Top Overlay "37" at 1665,644.98 h35; Top Overlay "36" at 1665,544.99 h35; Top Overlay "35" at 1665,444.99 h35; Top Overlay "34" at 1665,344.99 h35; Top Overlay "33" at 1665,244.99 h35; Top Overlay "32" at 864.01,244.98 h35; Bottom Overlay "VIN" at 1551,2544.98 h35; Bottom Overlay "3V3" at 1553,2344.98 h35; Bottom Overlay "23" at 1552,2244.98 h35; Bottom Overlay "GND" at 1545,1144.98 h35; Bottom Overlay "14" at 1552,1344.98 h35; Bottom Overlay "41" at 1550,1044.98 h35; Bottom Overlay "17" at 1551.99,1644.98 h35; Bottom Overlay "18" at 1551.99,1744.98 h35; Bottom Overlay "13" at 1552,1244.98 h35; Bottom Overlay "16" at 1552,1544.98 h35; Bottom Overlay "15" at 1551.99,1444.98 h35; Bottom Overlay "33" at 1552,244.99 h35; Bottom Overlay "34" at 1551,344.99 h35; Bottom Overlay "35" at 1552,444.99 h35; Bottom Overlay "36" at 1551,544.99 h35; Bottom Overlay "37" at 1551,644.98 h35; Bottom Overlay "28" at 1094,644.98 h35; Bottom Overlay "1" at 1054,2344.97 h35; Bottom Overlay "24" at 1092,1044.98 h35; Bottom Overlay "25" at 1091,944.98 h35; Bottom Overlay "12" at 1086,1244.98 h35; Bottom Overlay "3V3" at 1123,1144.98 h35; Bottom Overlay "11" at 1082,1344.98 h35; Bottom Overlay "10" at 1086,1444.97 h35; Bottom Overlay "5" at 1060,1944.97 h35; Bottom Overlay "4" at 1063.28,2044.97 h35; Bottom Overlay "3" at 1061,2144.97 h35; Bottom Overlay "9" at 1059,1544.97 h35; Bottom Overlay "7" at 1060,1744.97 h35; Bottom Overlay "8" at 1060,1644.97 h35; Bottom Overlay "6" at 1058,1844.97 h35; Bottom Overlay "2" at 1059,2244.97 h35; Bottom Overlay "0" at 1060,2444.97 h35; Bottom Overlay "VUSB" at 1453,2444.98 h35; Bottom Overlay "TX-" at 1323.57,2095.48 h35 r270; Bottom Overlay "LED" at 1402.31,2095.48 h35 r270; Bottom Overlay "RX+" at 1481.05,2095.48 h35 r270; Bottom Overlay "ON/OFF" at 1480,802.48 h35 r270; Bottom Overlay "PROG" at 1377.5,802.48 h35 r270; Bottom Overlay "GND" at 1277.5,803.48 h35 r270; Bottom Overlay "3V3" at 1177.5,802.48 h35 r270; Bottom Overlay "GND" at 1247,1894.97 h35; Bottom Overlay "GND" at 1246,1994.97 h35; Bottom Overlay "D+" at 1218,2094.97 h35; Bottom Overlay "D-" at 1218,2194.97 h35; Bottom Overlay "5V" at 1215,2294.97 h35; Bottom Overlay "VBAT" at 1077.5,803.48 h35 r270; Bottom Overlay "29" at 1090,544.98 h35; Bottom Overlay "30" at 1091,444.98 h35; Bottom Overlay "31" at 1085,344.98 h35; Bottom Overlay "32" at 1093,244.98 h35; Bottom Overlay "GND" at 1127,2544.97 h35; Bottom Overlay "GND" at 1402.31,1841.48 h35 r270; Bottom Overlay "RX-" at 1481.05,1838.48 h35 r270; Bottom Overlay "TX+" at 1323.57,1842.48 h35 r270; Top 3D Body "Teensy 4.1" at 1308.39,1422.32 h50 r270